# Altium PCB Plytka_gorna_lora_czujniki.PcbDoc
Units mm, origin at the board's own origin, x right, y up, seen from the top; angles counter-clockwise.
Board outline 49 x 49 mm, 2 copper layers (Top Layer, Bottom Layer), stack 1.58 mm thick; 12 components, 11 nets, 62 pads, 206 vias.
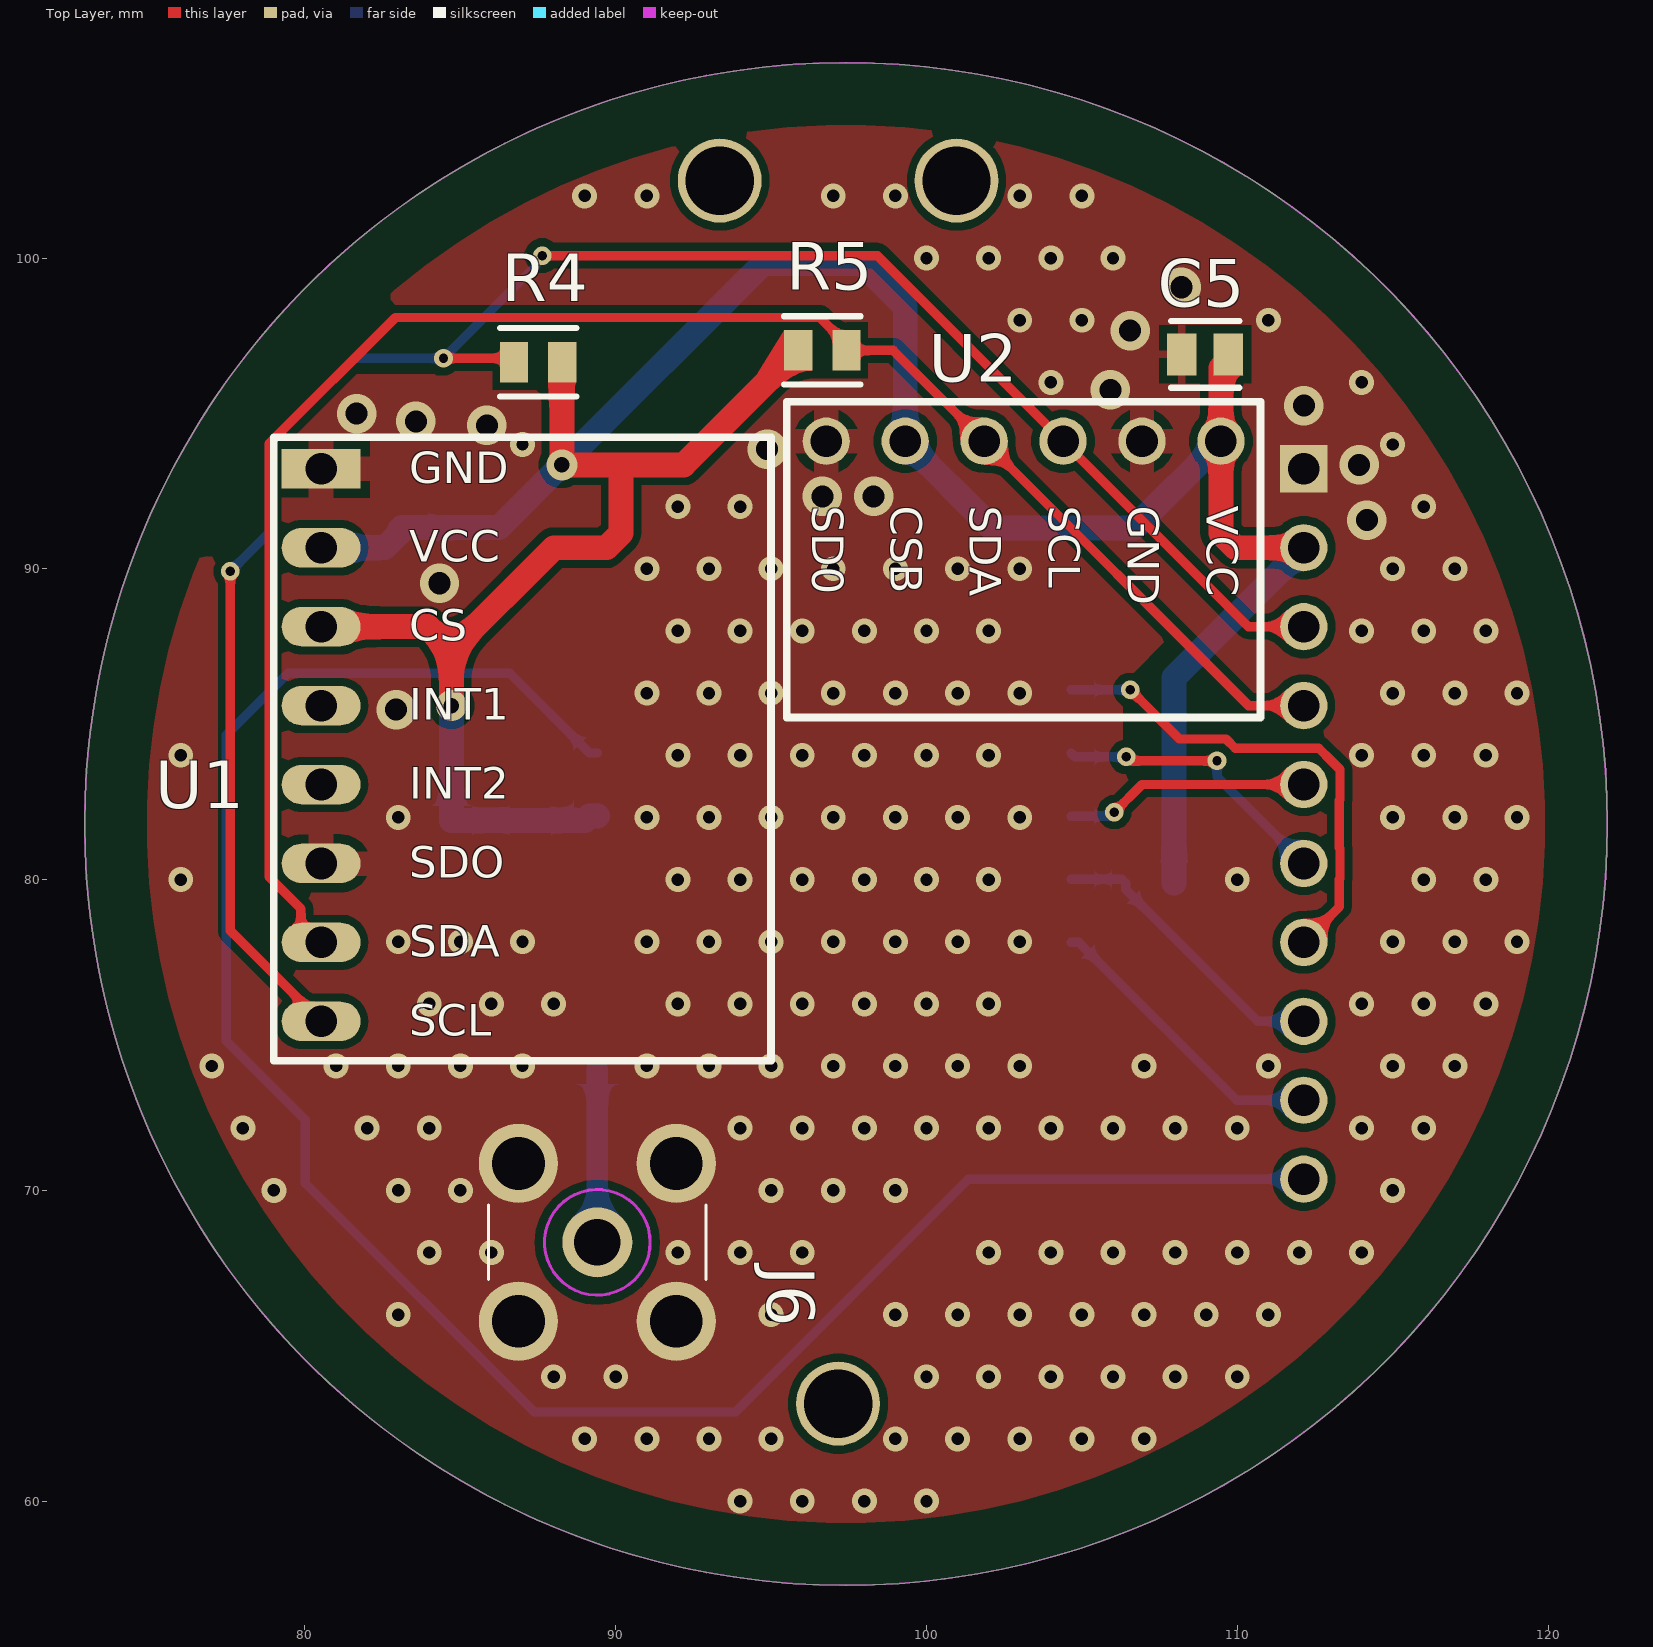
[diagram p0: Top Layer view]
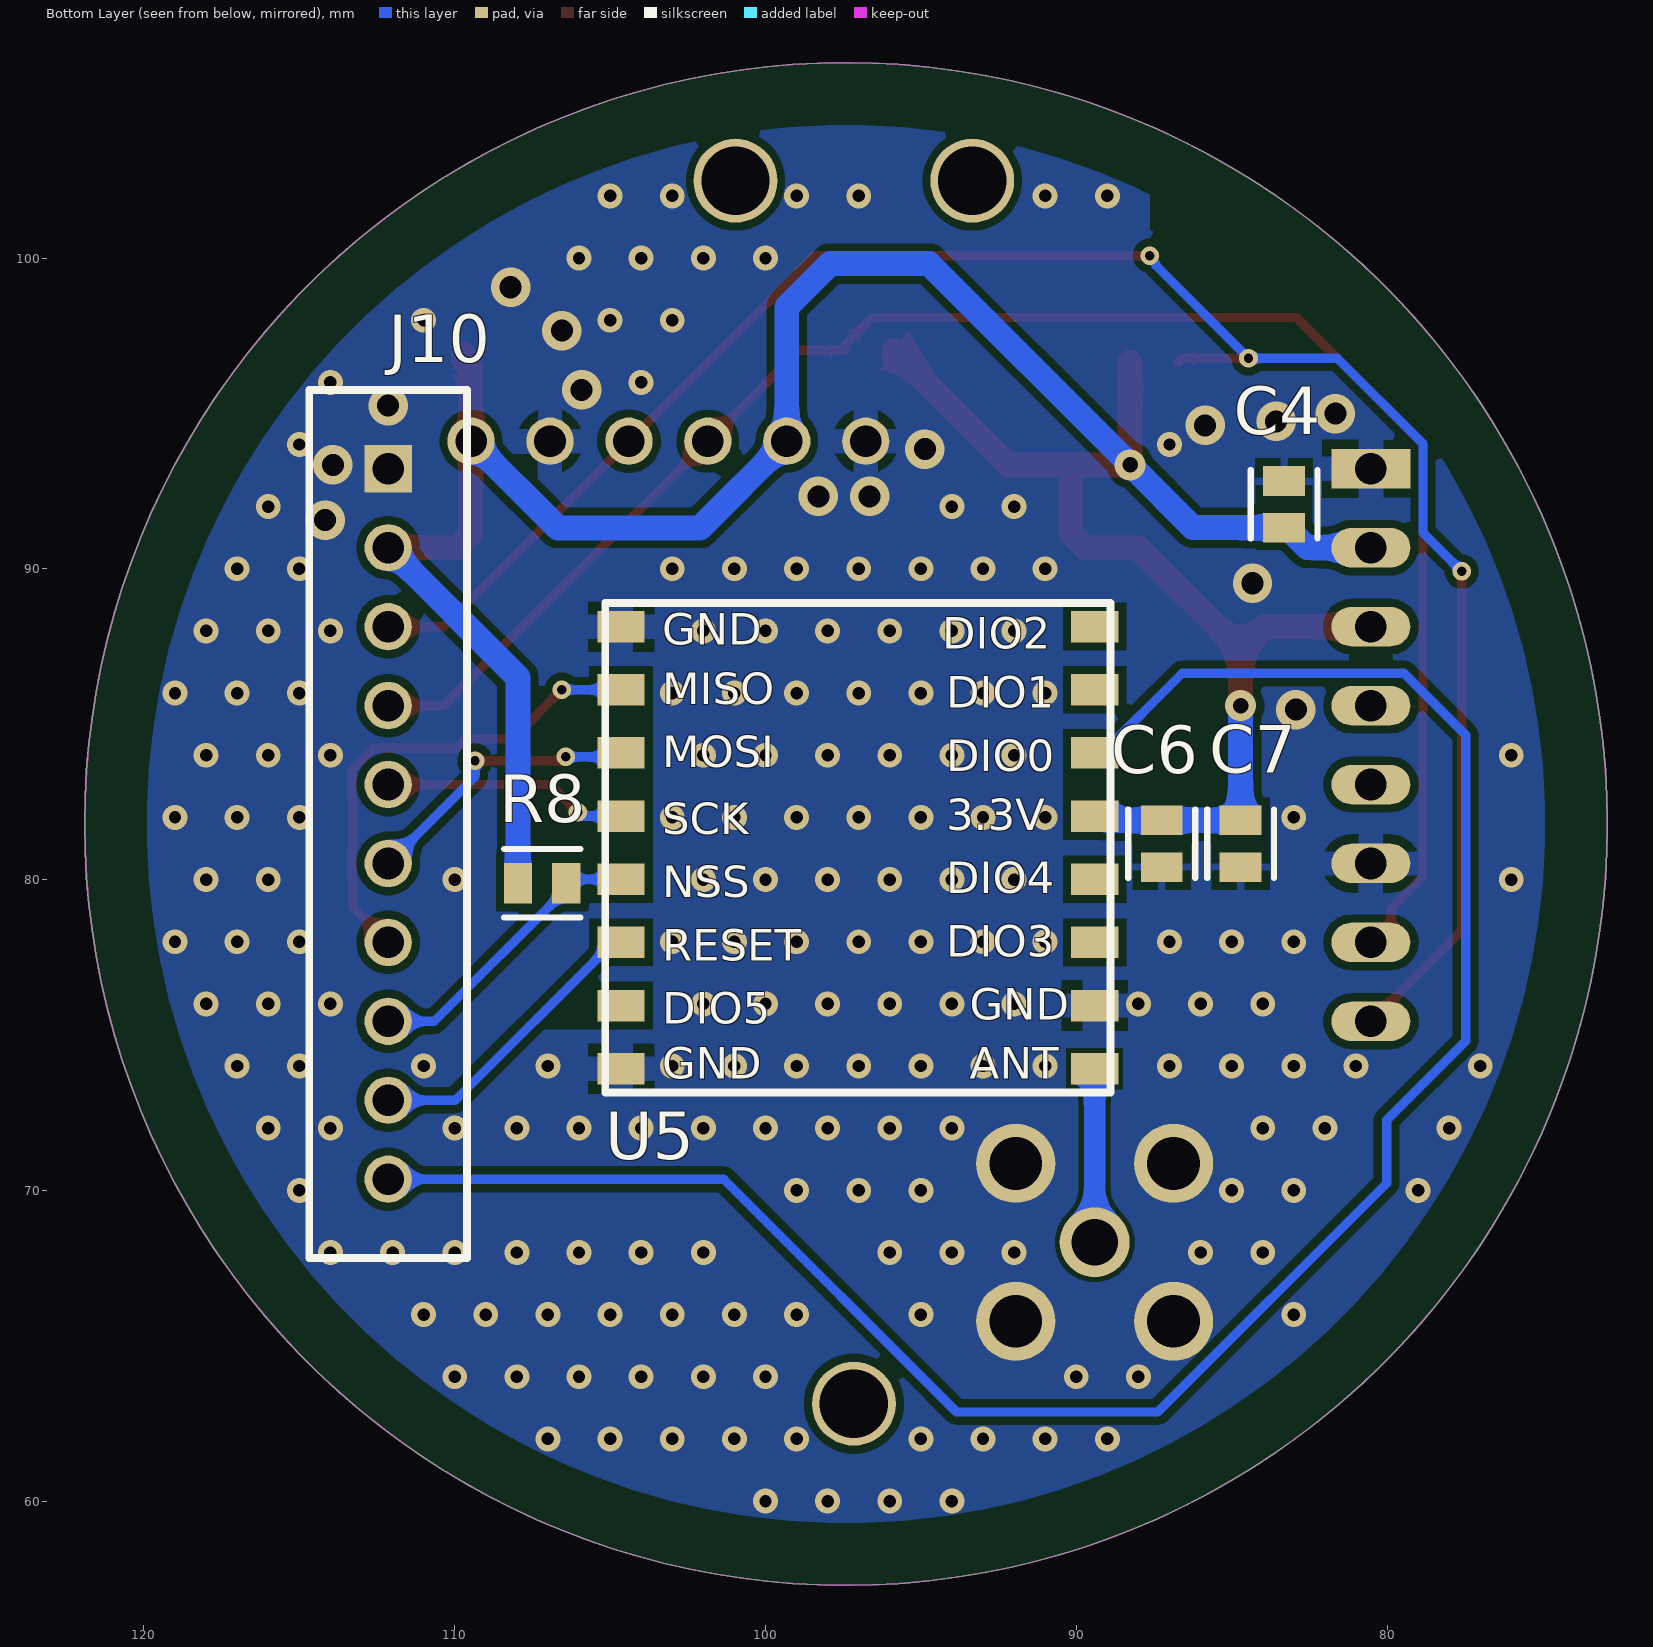
[diagram p1: Bottom Layer view, seen from below]
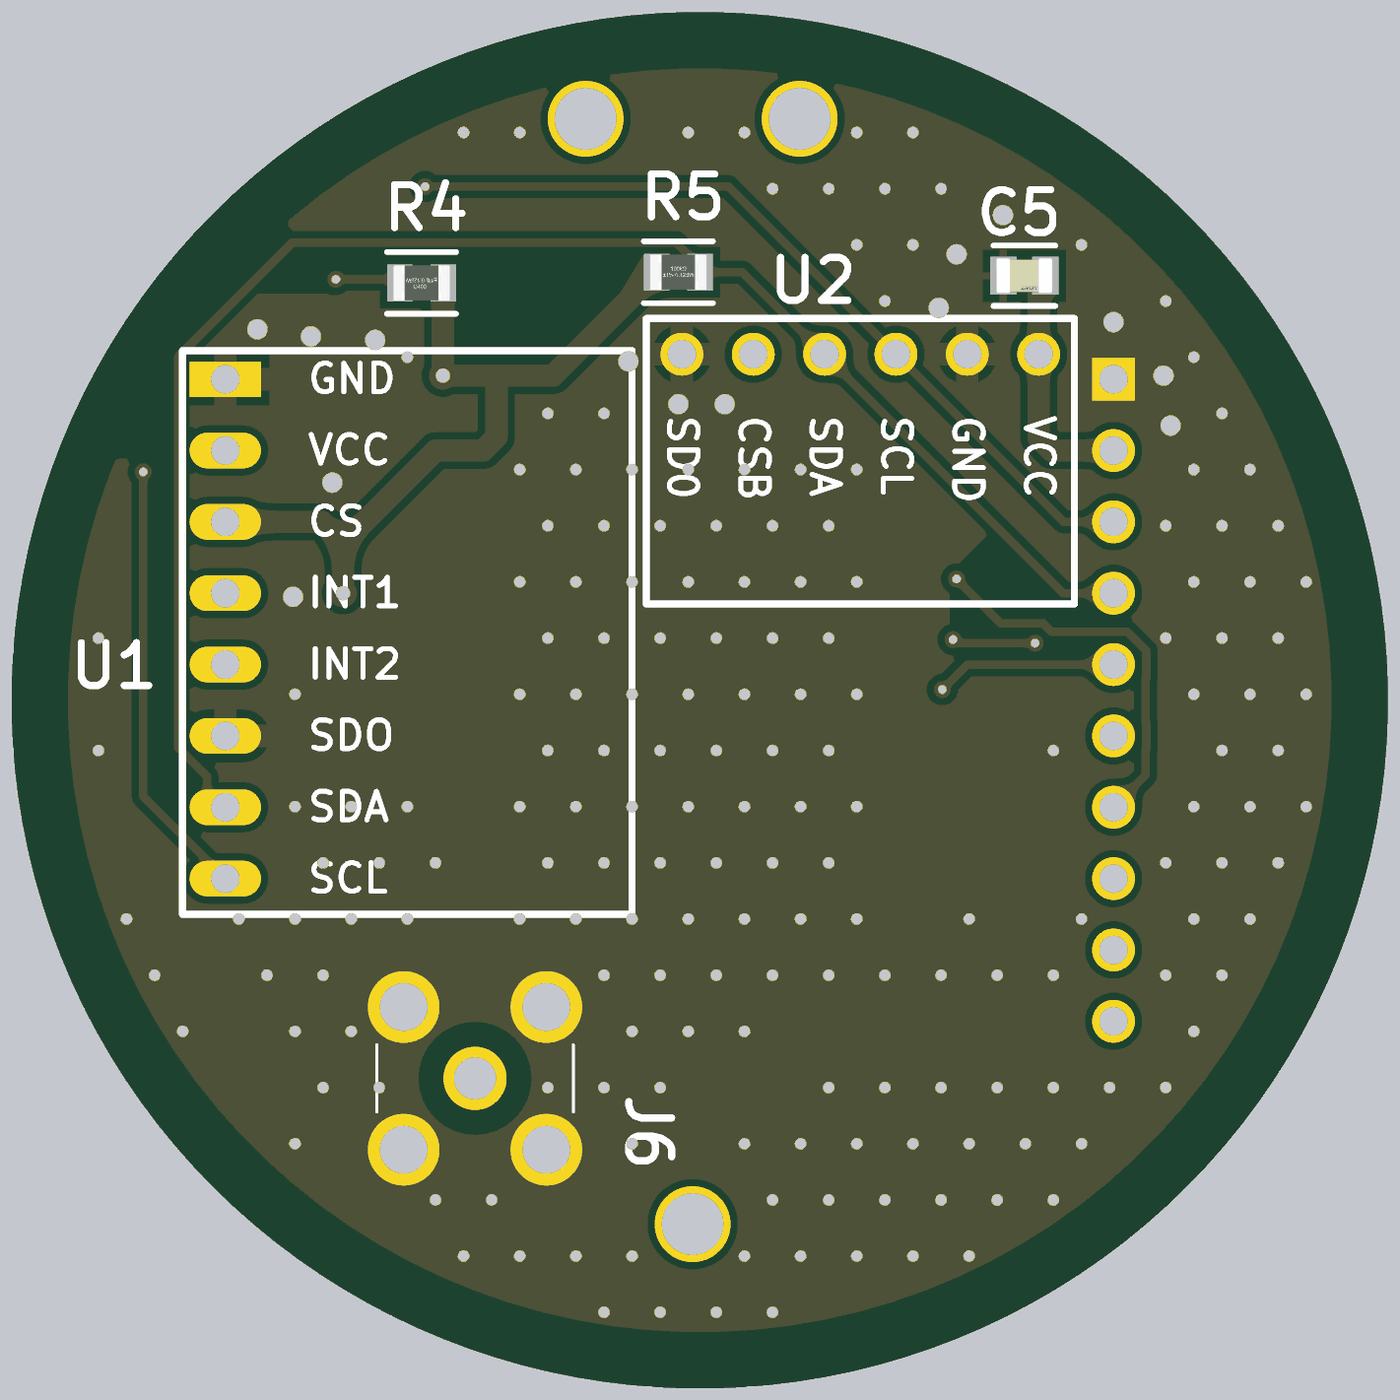
[diagram p2: 3D render of the assembled board from above, using the file's embedded part models]
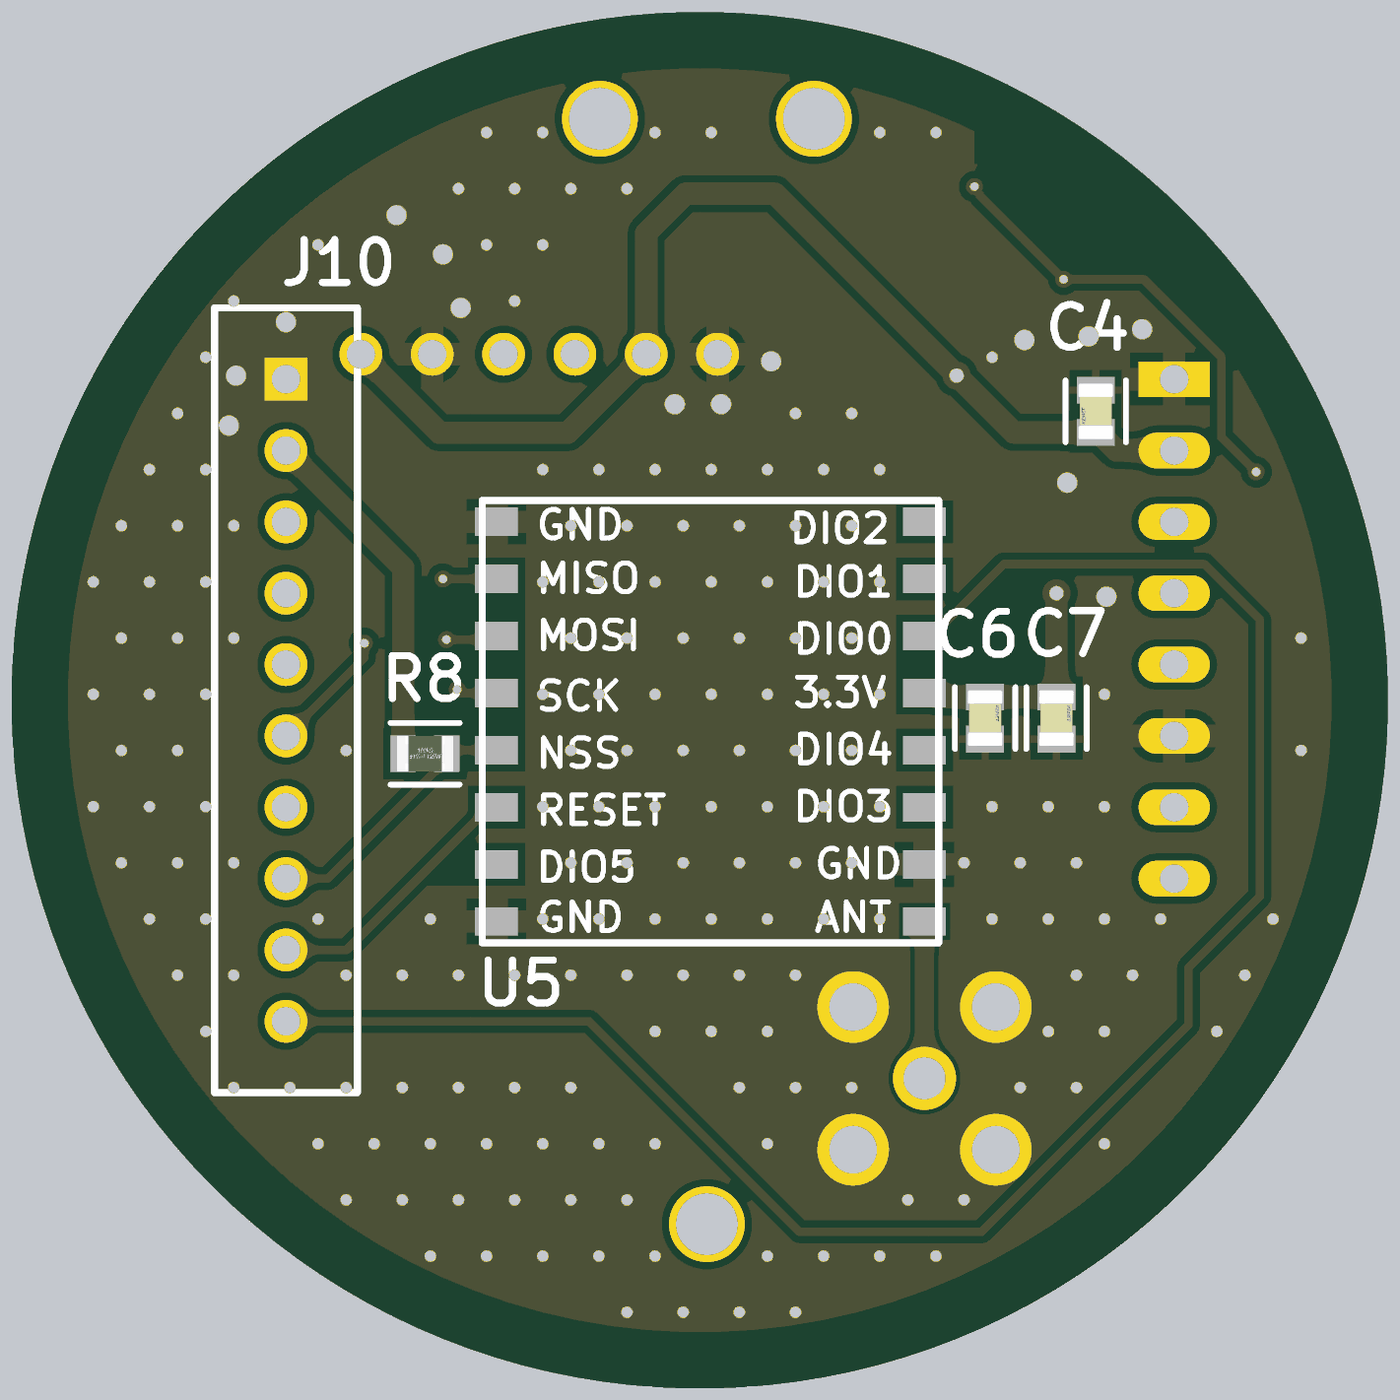
[diagram p3: 3D render of the assembled board from below, using the file's embedded part models]

## Layer stack, top to bottom
Top Solder: solder mask 0.0102, Solder Resist, Dk 3.5
Top Layer: signal copper 0.0356
Dielectric 1: dielectric 1.5086, FR-4, Dk 4.8
Bottom Layer: signal copper 0.0356
Bottom Solder: solder mask 0.0102, Solder Resist, Dk 3.5

## Board outline
72.909,81.788 ccw(c97.409,81.788) 97.409,57.288 ccw(c97.409,81.788) 121.909,81.788 ccw(c97.409,81.788) 97.409,106.288 ccw(c97.409,81.788)

## Design rules (kind name [scope] priority, off if disabled: settings)
AssemblyTestPointUsage AssemblyTestPointUsage_1 [All] p2:
AssemblyTestpoint AssemblyTestpoint_1 [All] p2: testpointundercomponent=TRUE minsize=1.016 maxsize=2.54 preferedsize=1.524 minholesize=0 maxholesize=1.016 preferedholesize=0.813 testpointgrid=0.025 usegrid=TRUE gridtolerance=0 allowsidetop=TRUE allowsidebottom=TRUE
BoardOutlineClearance [All] p1: gap=2 ignorepadtopadclearanceinfootprint=FALSE except(0: Text-OutlineEdge Text-CavityEdge Text-CutoutEdge Text-SplitBarrior Text-SplitContinuation; 0.5: Arc-OutlineEdge Arc-CavityEdge Arc-CutoutEdge Arc-SplitBarrior Arc-SplitContinuation Track-OutlineEdge Track-CavityEdge Track-CutoutEdge Track-SplitBarrior Track-SplitContinuation)
Clearance Antena_1 [InNetClass('RF_50R') vs InNet('GND')] p1: gap=0.15 ignorepadtopadclearanceinfootprint=FALSE
Clearance [All] p2: gap=0.254 ignorepadtopadclearanceinfootprint=FALSE
ComponentClearance ComponentClearance_1 [All] p2: gap=0.254 collisioncheckmode=3 verticalgap=0.254 showdistances=FALSE
DiffPairsRouting DiffPairsRouting_1 [All] p2: maxlimit=0.254 minlimit=0.254 mostfreqgap=0.254 toplayer_minwidth=0.381 toplayer_maxwidth=0.381 toplayer_prefwidth=0.381 bottomlayer_minwidth=0.381 bottomlayer_maxwidth=0.381 bottomlayer_prefwidth=0.381 maxuncoupledlength=12.7
FabricationTestPointUsage FabricationTestPointUsage_1 [All] p2: valid=0 allowmultiple=FALSE
FabricationTestpoint FabricationTestpoint_1 [All] p2: side=3 testpointundercomponent=TRUE minsize=1.016 maxsize=2.54 preferedsize=1.524 minholesize=0 maxholesize=1.016 preferedholesize=0.813 testpointgrid=0.025 allowsidetop=TRUE allowsidebottom=TRUE usegrid=TRUE gridtolerance=0
FanoutControl Fanout_BGA_1 [IsBGA] p1: bgadir=Out bgaviamode=Centered fanoutstyle=Auto fanoutdirection=Alternating viagrid=0.025 // Fanout_BGA (Default Rule)
FanoutControl Fanout_BGA [IsBGA] p2: bgadir=Out bgaviamode=Centered fanoutstyle=Auto fanoutdirection=Alternating viagrid=0.025 // Fanout_BGA (Default Rule)
FanoutControl Fanout_LCC [IsLCC] p3: bgadir=Out bgaviamode=Centered fanoutstyle=Auto fanoutdirection=Alternating viagrid=0.025 // Fanout_LCC (Default Rule)
FanoutControl Fanout_LCC_1 [IsLCC] p4: bgadir=Out bgaviamode=Centered fanoutstyle=Auto fanoutdirection=Alternating viagrid=0.025 // Fanout_LCC (Default Rule)
FanoutControl Fanout_SOIC_1 [IsSOIC] p5: bgadir=Out bgaviamode=Centered fanoutstyle=Auto fanoutdirection=Alternating viagrid=0.025 // Fanout_SOIC (Default Rule)
FanoutControl Fanout_SOIC [IsSOIC] p6: bgadir=Out bgaviamode=Centered fanoutstyle=Auto fanoutdirection=Alternating viagrid=0.025 // Fanout_SOIC (Default Rule)
FanoutControl Fanout_Small_1 [(CompPinCount < 5)] p7: bgadir=Out bgaviamode=Centered fanoutstyle=Auto fanoutdirection=OutThenIn viagrid=0.025 // Fanout_Small (Default Rule)
FanoutControl Fanout_Small [(CompPinCount < 5)] p8: bgadir=Out bgaviamode=Centered fanoutstyle=Auto fanoutdirection=OutThenIn viagrid=0.025 // Fanout_Small (Default Rule)
FanoutControl Fanout_Default [All] p9: bgadir=Out bgaviamode=Centered fanoutstyle=Auto fanoutdirection=Alternating viagrid=0.025 // Fanout_Default (Default Rule)
FanoutControl Fanout_Default_1 [All] p10: bgadir=Out bgaviamode=Centered fanoutstyle=Auto fanoutdirection=Alternating viagrid=0.025 // Fanout_Default (Default Rule)
Height Height_1 [All] p2: minheight=0 maxheight=25.4 prefheight=12.7
HoleSize HoleSize_1 [All] p2: absolutevalues=TRUE maxlimit=2.54 minlimit=0.025 maxpercent=80.000 minpercent=20.000
HoleToHoleClearance HoleToHoleClearance_1 [All] p2: gap=0.254 allowstackedmicrovias=TRUE
LayerPairs LayerPairs_1 [All] p2: enforce=TRUE
MinimumSolderMaskSliver MinimumSolderMaskSliver_1 [All] p2: minsoldermaskwidth=0.254
NetAntennae NetAntennae_1 [All] p2: netantennaetolerance=0
PasteMaskExpansion PasteMaskExpansion_1 [All] p2: expansion=0
PlaneClearance PlaneClearance_1 [All] p2: clearance=0.508
PlaneConnect PlaneConnect_1 [All] p2: planeconnectstyle=Relief reliefexpansion=0.508 reliefentries=4 reliefconductorwidth=0.254 reliefairgap=0.254
PolygonConnect DirectConnect_Serwa [(InComponent('J10') or InComponent('J6')) and InNet('GND')] p1: connectstyle=Direct reliefconductorwidth=0.254 reliefentries=4 polygonreliefangle="90 Angle" airgapwidth=0.254
PolygonConnect PolygonConnect_J1 [All vs InComponent('U1') or InComponent('U2') or InComponent('U5')] p2: connectstyle=Relief reliefconductorwidth=0.8 reliefentries=4 polygonreliefangle="90 Angle" airgapwidth=0.3
PolygonConnect Relief_U4_Przetwornica [InComponent('U4') and InNet('GND')] p3: connectstyle=Relief reliefconductorwidth=0.6 reliefentries=4 polygonreliefangle="90 Angle" airgapwidth=0.254
PolygonConnect PolygonConnect_1 [All] p4: thpad.connectstyle=Relief thpad.reliefconductorwidth=0.254 thpad.reliefentries=4 thpad.polygonreliefangle="90 Angle" thpad.airgapwidth=0.254 smdpad.connectstyle=Relief smdpad.reliefconductorwidth=0.254 smdpad.reliefentries=4 smdpad.polygonreliefangle="90 Angle" smdpad.airgapwidth=0.254 via.connectstyle=Direct via.reliefconductorwidth=0.254 via.reliefentries=4 via.polygonreliefangle="90 Angle" via.airgapwidth=0.254
RoutingCorners RoutingCorners_1 [All] p2: cornerstyle=45-Degree minsetback=2.54 maxsetback=2.54
RoutingLayers RoutingLayers_1 [All] p2: top layer_v5=TRUE bottom layer_v5=TRUE
RoutingPriority RoutingPriority_1 [All] p2: routingpriority=0
RoutingTopology RoutingTopology_1 [All] p2: topology=Shortest
RoutingVias [All] p1: holewidth=0.3 width=0.6 viastyle="Through Hole" minholewidth=0.2 minwidth=0.45 maxholewidth=0.8 maxwidth=1.5
ShortCircuit ShortCircuit_1 [All] p2: allowed=FALSE
SilkToSilkClearance SilkToSilkClearance_1 [All] p2: silktosilkclearance=0.254
SilkToSolderMaskClearance SilkToSolderMaskClearance_1 [IsPad] p2: minsilkscreentomaskgap=0.254 clearancetoexposedcopper=TRUE
SolderMaskExpansion SolderMask_Vias_Tented [IsVia] p1: expansion=0 istentingtop=TRUE
SolderMaskExpansion SolderMaskExpansion_1 [All] p2: expansion=0 istentingtop=FALSE
SupplyNets "Schematic Supply Nets" [InNet('GND')] p1: voltage=0.000
UnRoutedNet UnRoutedNet_1 [All] p2:
UnpouredPolygon UnpouredPolygon_1 [All] p2:
Width Antena [InNetClass('RF_50R')] p1: maxlimit=0.689 minlimit=0.689 preferedwidth=0.689 impedanceprofiledriven=TRUE impedanceprofileid={41299183-0908-48C8-ACB2-1323AC1D632C} impedanceprofilevalue=50.000000 minimp=50.000000 maximp=50.000000 favimp=50.000000
Width Width_1 [InNet('VCC') or InNet('+5V') or InNet('+3.3V') or InNet('NetJ1_2') or InNet('NetD1_2') or InNet('NetJ3_1') or InNet('NetD1_1') or InNet('NetD2_1')] p2: maxlimit=1.2 minlimit=0.6 preferedwidth=0.8
Width Width_2 [All] p3: maxlimit=0.5 minlimit=0.2 preferedwidth=0.3
25 further rules are at their usual default settings.

## Classes and differential pairs
net class RF_50R: NetJ6_5

## Components (designator, comment, footprint, x,y, rotation, side; value= is the part's Value field where it differs from the comment)
C4 "100nF" FP-C0805C-DN-MFG 83.312,92.075 r90 bottom value="0.10 μF"
C5 "100nF" FP-C0805C-DN-MFG 108.966,96.901 r180 top value="0.10 μF"
C6 "10uF" FP-C0805C-DN-MFG 87.249,81.153 r270 bottom value=10μF
C7 "100nF" FP-C0805C-DN-MFG 84.709,81.153 r270 bottom value="0.10 μF"
J6 "RF2-19A-T-00-50-G" RF219AT0050G 86.868,70.866 r270 top
J10 "PrzejscieTHT10" PrzejscieTHT10 114.681,67.818 r180 bottom
R4 "4.7kΩ" FP-CRGCQ0805-IPC_C 87.503,96.647 r180 top value=4.7KΩ
R5 "4.7kΩ" FP-CRGCQ0805-IPC_C 96.647,97.028 r0 top value=4.7KΩ
R8 "10kΩ" FP-CRGCQ0805-IPC_C 107.188,79.883 r180 bottom value=10KΩ
U1 "ADXL345" ADXL345 80.01,93.218 r0 top
U2 "BMP280" BMP280 95.504,95.377 r270 top
U5 "RFM95W-868S2R" RFM95W-868S2R 105.156,73.152 r180 bottom

## Footprints (in the part's own frame and the unit in brackets; to place one, negate y for a bottom-side part, rotate by r counter-clockwise, add the part's x,y. Pads: shape width x height; smd on the part's side, far side on the other; paste and mask are expansions set on the pad)
ADXL345 [mil]
  rect 100x50 hole 40: 1(20,0)
  oval 100x50 hole 40: 2(20,-100) 3(20,-200) 4(20,-300) 5(20,-400) 6(20,-500) 7(20,-600) 8(20,-700)
  silkscreen extent -40,-750 590,40
BMP280 [mil]
  round 60 hole 40: 1(50,550) 2(50,450) 3(50,350) 4(50,250) 5(50,150) 6(50,50)
  silkscreen extent 0,0 400,600
FP-C0805C-DN-MFG [mm]
  rect 0.95x1.35 smd paste+0 mask+0: 1(-0.75,0) 2(0.75,0)
  silkscreen extent -1.1,-1.07 1.1,1.07, body extent -1,-0.63 1,0.63, height 0.88
FP-CRGCQ0805-IPC_C [mm]
  rect 0.906x1.31 smd paste+0 mask+0: 1(-0.776,0) 2(0.776,0)
  silkscreen extent -1.23,-1.1 1.23,1.1, body extent -1.33,-0.8 1.33,0.8, height 0.25
PrzejscieTHT10 [mil]
  rect 60x60 hole 40: 1(100,1000)
  round 60 hole 40: 2(100,900) 3(100,800) 4(100,700) 5(100,600) 6(100,500) 7(100,400) 8(100,300) 9(100,200) 10(100,100)
  silkscreen extent 0,0 200,1100
RF219AT0050G [mm]
  round 2.55 hole 1.7: 1(0,0) 2(0,5.08) 3(5.08,0) 4(5.08,5.08)
  round 2.25 hole 1.5: 5(2.54,2.54)
  silkscreen extent 1.34,-0.96 3.74,6.04
RFM95W-868S2R [mil]
  rect 60x40 smd: 1(20,590) 2(20,510) 3(20,430) 4(20,350) 5(20,270) 6(20,190) 7(20,110) 8(20,30) 9(620,30) 10(620,110) 11(620,190) 12(620,270) 13(620,350) 14(620,430) 15(620,510) 16(620,590)
  silkscreen extent 0,0 640,620

## Part data
C4 C5 C7: library part CMP-2007-00274-2, "CAP CER 0.1UF 16V X7R 0805", Capacitance="0.10 μF", Manufacturer=KEMET, Manufacturer Part Number=C0805C104K4RACTU, Package=C0805C-DN, Temperature="-55°C to +125°C", Temperature Characteristic=X7R, Temperature Coefficient=30ppm/°C, Temperature Range High=+125°C, Temperature Range Low=-55°C, Tolerance=0.1, Voltage Rating="16 V", Automotive=No, Category=Cap, ComponentLink2Description=Datasheet, ComponentLink2URL=https://content.kemet.com/datasheets/KEM_C1003_C0G_SMD.pdf, Device Class L1="Passive Components", Device Class L2=Capacitors, Device Class L3="Ceramic Capacitors", Digikey Description="CAP CER 0.1UF 16V X7R 0805", Height=0.88mm, Ipc Land Pattern Name=CAPC200125X78, Lead Free=Yes, Material=Ceramic, Mouser Description="Multilayer Ceramic Capacitors MLCC - SMD/SMT 16volts 0.1uF X7R 10%", Octopart=https://octopart.com/c0805c104k4ractu-kemet-92155, RoHS=TRUE
C6: library part CMP-2007-00274-2, "CAP CER 10UF 16V X7R 0805", Capacitance=10μF, Manufacturer=KEMET, Manufacturer Part Number=C0805C104K4RACTU, Package=C0805C-DN, Temperature="-55°C to +125°C", Temperature Characteristic=X7R, Temperature Coefficient=30ppm/°C, Temperature Range High=+125°C, Temperature Range Low=-55°C, Tolerance=0.1, Voltage Rating="16 V", Automotive=No, Category=Cap, ComponentLink2Description=Datasheet, ComponentLink2URL=https://content.kemet.com/datasheets/KEM_C1003_C0G_SMD.pdf, Device Class L1="Passive Components", Device Class L2=Capacitors, Device Class L3="Ceramic Capacitors", Digikey Description="CAP CER 0.1UF 16V X7R 0805", Height=0.88mm, Ipc Land Pattern Name=CAPC200125X78, Lead Free=Yes, Material=Ceramic, Mouser Description="Multilayer Ceramic Capacitors MLCC - SMD/SMT 16volts 0.1uF X7R 10%", Octopart=https://octopart.com/c0805c104k4ractu-kemet-92155, RoHS=TRUE
J6: "Conn SMA 0Hz to 18GHz 50Ohm Solder ST Thru-Hole RCP Gold", Manufacturer_Name="Adam Tech", Mouser Part Number=737-RF219AT0050G, Arrow Part Number=RF2-19A-T-00-50-G, Arrow Price/Stock=https://www.arrow.com/en/products/rf2-19a-t-00-50-g/adam-tech?region=nac, Datasheet Link=chrome-extension://efaidnbmnnnibpcajpcglclefindmkaj/https://www.mouser.it/datasheet/2/4/rf2_19a_t_00_50_g_data_sheet-3397228.pdf, Geometry.Height=9.6mm, Manufacturer_Part_Number=RF2-19A-T-00-50-G, Mouser Price/Stock=https://www.mouser.co.uk/ProductDetail/Adam-Tech/RF2-19A-T-00-50-G?qs=HoCaDK9Nz5fMXe4fVjtozw%3D%3D
R4 R5: library part CMP-03211-002989-1, "CRGCQ 0805 4.7K 5%", Ambient Temperature Range High=+70°C, Manufacturer="TE Connectivity", Manufacturer Part Number=CRGCQ0805J10K, Package=CRGCQ0805, Power Rating=0.125W, Resistance=4.7KΩ, Temperature="-55°C to +155°C", Temperature Coefficient=±100ppm/°C, Temperature Range High=+155°C, Temperature Range Low=-55°C, Tolerance=0.05, Voltage Rating=150V, Automotive=Yes, Automotive Grade="Grade 914", Category=Res, ComponentLink2Description=Datasheet, ComponentLink2URL=https://www.te.com/commerce/DocumentDelivery/DDEController?Action=showdoc&DocId=Data+Sheet%7F1773204-3%7F1%7Fpdf%7FEnglish%7FENG_DS_1773204-3_1.pdf%7F4-2176341-923, Composition="Thick Film", Device Class L1="Passive Components", Device Class L2=Resistors, Device Class L3="Chip SMD Resistors", Digikey Description="CRGCQ 0805 10K 5%", Height=0.65mm, Ipc Land Pattern Name=RESC200125X55, Lead Free=Yes, Mouser Description="Res Thick Film 0805 10K Ohm 5% 0.125W(1/8W) ±100ppm/C Pad SMD Automotive T/R", Octopart=https://octopart.com/crgcq0805j10k-te+connectivity-91018201, RoHS=TRUE, Series=CRGCQ
R8: library part CMP-03211-002989-1, "CRGCQ 0805 10K 5%", Ambient Temperature Range High=+70°C, Manufacturer="TE Connectivity", Manufacturer Part Number=CRGCQ0805J10K, Package=CRGCQ0805, Power Rating=0.125W, Resistance=10KΩ, Temperature="-55°C to +155°C", Temperature Coefficient=±100ppm/°C, Temperature Range High=+155°C, Temperature Range Low=-55°C, Tolerance=0.05, Voltage Rating=150V, Automotive=Yes, Automotive Grade="Grade 914", Category=Res, ComponentLink2Description=Datasheet, ComponentLink2URL=https://www.te.com/commerce/DocumentDelivery/DDEController?Action=showdoc&DocId=Data+Sheet%7F1773204-3%7F1%7Fpdf%7FEnglish%7FENG_DS_1773204-3_1.pdf%7F4-2176341-923, Composition="Thick Film", Device Class L1="Passive Components", Device Class L2=Resistors, Device Class L3="Chip SMD Resistors", Digikey Description="CRGCQ 0805 10K 5%", Height=0.65mm, Ipc Land Pattern Name=RESC200125X55, Lead Free=Yes, Mouser Description="Res Thick Film 0805 10K Ohm 5% 0.125W(1/8W) ±100ppm/C Pad SMD Automotive T/R", Octopart=https://octopart.com/crgcq0805j10k-te+connectivity-91018201, RoHS=TRUE, Series=CRGCQ

## Free pads (board coordinates)
  round 2.7 hole 2.2: 3(93.345,102.489) 4(100.965,102.489) 5(97.155,63.135)

## Via types
v1: diameter 0.8, hole 0.4, Top Layer to Bottom Layer, tented both sides, 183 vias
v2: diameter 1.27, hole 0.711, Top Layer to Bottom Layer, tented both sides, 14 vias
v3: diameter 0.6, hole 0.3, Top Layer to Bottom Layer, tented both sides, 7 vias
v4: diameter 1, hole 0.5, Top Layer to Bottom Layer, tented both sides, 2 vias

## Nets (pads, with @x,y where several pads share a name; then routed paths per layer and width w, separated by ;. In a path a pad name is that pad's centre, name@x,y a point inside that pad or via, vN(x,y) a via of type N, cw(c..) or ccw(c..) an arc to the next point about the centre after c; other vN are vias at no path point)
+3.3V: C4.1 C5.1 C6.1 C7.1 J10.2 R4.1 R5.1 R8.1 U1.2 U1.3 U2.1 U2.5 U5.13 | length 97.8
  Top Layer w0.8: U1.3 83.947,88.138 84.709,87.376 ; v4(84.709,85.598) 84.709,87.376 ; R4.1 88.265,96.633 v4(88.265,93.345) 90.226,93.345 ; R5.1 95.871,96.826 95.818,96.773 95.616,96.773 92.188,93.345 90.226,93.345 ; C5.1 109.716,96.701 109.474,96.459 U2.1 109.474,91.147 109.943,90.678 J10.2 ; 84.709,87.376 88.011,90.678 89.701,90.678 90.17,91.147 90.17,93.289 90.226,93.345
  Bottom Layer w0.8: U1.2 82.568,90.678 83.037,91.147 83.037,91.25 83.112,91.325 C4.1 86.245,91.325 v4(88.265,93.345) 94.742,99.822 97.917,99.822 99.314,98.425 U2.5 102.108,91.313 106.68,91.313 U2.1 ; v4(84.709,85.598) C7.1 C6.1 89.015,81.903 89.154,82.042 U5.13 ; R8.1 107.964,86.501 J10.2
GND: C4.2 C5.2 C6.2 C7.2 J6.1 J6.2 J6.3 J6.4 J10.1 U1.1 U1.6 U2.2 U2.6 U5.1 U5.8 U5.10
  other v1: 94,60 96,60 98,60 100,60 89,62 91,62 93,62 95,62 99,62 101,62 103,62 105,62 107,62 88,64 90,64 100,64 102,64 104,64 106,64 108,64 110,64 83,66 95,66 99,66 101,66 103,66 105,66 107,66 109,66 111,66 84,68 86,68 92,68 94,68 96,68 102,68 104,68 106,68 108,68 110,68 112,68 114,68 79,70 83,70 85,70 95,70 97,70 99,70 115,70 78,72 82,72 84,72 94,72 96,72 98,72 100,72 102,72 104,72 106,72 108,72 110,72 114,72 116,72 77,74 81,74 83,74 85,74 87,74 91,74 93,74 95,74 97,74 99,74 101,74 103,74 107,74 111,74 115,74 117,74 84,76 86,76 88,76 92,76 94,76 96,76 98,76 100,76 102,76 114,76 116,76 118,76 83,78 85,78 87,78 91,78 93,78 95,78 97,78 99,78 101,78 103,78 115,78 117,78 119,78 76,80 92,80 94,80 96,80 98,80 100,80 102,80 110,80 116,80 118,80 83,82 91,82 93,82 95,82 97,82 99,82 101,82 103,82 115,82 117,82 119,82 76,84 92,84 94,84 96,84 98,84 100,84 102,84 114,84 116,84 118,84 91,86 93,86 95,86 97,86 99,86 101,86 103,86 115,86 117,86 119,86 92,88 94,88 96,88 98,88 100,88 102,88 114,88 116,88 118,88 91,90 93,90 95,90 97,90 99,90 101,90 103,90 115,90 117,90 92,92 94,92 116,92 87,94 115,94 104,96 114,96 103,98 105,98 111,98 100,100 102,100 104,100 106,100 89,102 91,102 97,102 99,102 103,102 105,102
  other v2: 82.931,85.471 84.328,89.535 114.173,91.567 96.647,92.329 98.298,92.329 113.919,93.345 94.869,93.853 85.852,94.615 83.566,94.742 81.661,94.996 112.141,95.25 105.918,95.758 106.553,97.663 108.204,99.06
I2C_SCL: J10.3 R4.2 U1.8 U2.3 | length 63.5
  Top Layer w0.3: v3(77.597,89.916) 77.597,78.359 U1.8 ; v3(84.455,96.774) 86.6,96.774 R4.2 ; v3(87.63,100.076) 98.425,100.076 U2.3 110.363,88.138 J10.3
  Bottom Layer w0.3: v3(77.597,89.916) 78.844,91.163 78.844,94.02 81.598,96.774 v3(84.455,96.774) 87.446,99.765 87.446,99.81 87.63,99.995 v3(87.63,100.076)
I2C_SDA: J10.4 R5.2 U1.7 U2.4 | length 57.1
  Top Layer w0.3: U1.7 80.317,77.978 79.869,78.426 79.869,79.063 78.844,80.088 78.844,94.02 82.911,98.087 96.566,98.087 97.423,97.23 R5.2 98.933,97.028 U2.4 110.363,85.598 J10.4
LORA_CS: J10.8 R8.2 U5.5 | length 9.5
  Bottom Layer w0.3: U5.5 106.285,80.01 R8.2 106.412,79.681 110.655,75.438 J10.8
LORA_DIO0: J10.10 U5.14 | length 67.6
  Bottom Layer w0.3: U5.14 89.154,84.074 86.591,86.637 79.453,86.637 77.47,84.654 77.47,74.803 80.01,72.263 80.01,70.231 87.376,62.865 93.853,62.865 101.346,70.358 J10.10
LORA_RST: J10.9 U5.6 | length 9.6
  Bottom Layer w0.3: U5.6 104.902,77.978 109.982,72.898 J10.9
NetJ6_5: J6.5 U5.9 | length 5.6
  Bottom Layer w0.689: J6.5 U5.9
SPI_MISO: J10.7 U5.2 | length 15.8
  Top Layer w0.3: v3(106.553,86.106) 108.135,84.524 109.639,84.524 109.939,84.224 112.624,84.224 113.029,83.819 113.307,83.541 113.307,82.575 113.284,82.552 113.284,81.024 113.307,81.001 113.307,80.035 113.284,80.012 113.284,79.121 J10.7
  Bottom Layer w0.3: U5.2 v3(106.553,86.106)
SPI_MOSI: J10.6 U5.3 | length 9.3
  Top Layer w0.3: v3(106.426,83.947) 106.553,83.82 v3(109.347,83.82)
  Bottom Layer w0.3: U5.3 104.775,83.947 v3(106.426,83.947) ; v3(109.347,83.82) 109.347,83.312 J10.6
SPI_SCK: J10.5 U5.4 | length 7.9
  Top Layer w0.3: v3(106.045,82.169) 106.934,83.058 J10.5
  Bottom Layer w0.3: U5.4 105.837,82.042 105.964,82.169 v3(106.045,82.169)
pads on no net: U1.4 U1.5 U5.7 U5.11 U5.12 U5.15 U5.16

## Polygon pours and split planes (outlines as drawn)
GND on Top Layer "GND_L01_P000" (solid, remove dead copper, pour order 0): 72.909,81.788 ccw(c97.409,81.788) 97.409,57.288 ccw(c97.409,81.788) 121.909,81.788 ccw(c97.409,81.788) 97.409,106.288 ccw(c97.409,81.788)
GND on Bottom Layer "GND_L02_P001" (solid, remove dead copper, pour order 1): 72.909,81.788 ccw(c97.409,81.788) 97.409,57.288 ccw(c97.409,81.788) 121.909,81.788 ccw(c97.409,81.788) 97.409,106.288 ccw(c97.409,81.788)

## Keep-outs
Top Layer:
  circle w0.1: c89.408,68.326 r1.7
Keep-Out Layer:
  circle w0.05: c97.409,81.788 r24.5

## Other copper
Top Layer:
  pour cut-out: 80.197,95.956 80.368,95.956 82.911,98.499 82.603,98.806 82.55,98.806 80.01,96.266
  pour cut-out: 106.316,84.501 106.316,85.56 106.324,85.552 106.524,85.552 107.645,84.432 107.562,84.349 107.562,84.232 106.908,84.232 106.74,84.4 106.74,84.417 106.621,84.417 106.536,84.501
  pour cut-out: 84.345,96.22 84.299,96.266 81.672,96.266 83.081,97.675 85.901,97.675 86.02,97.556 86.02,97.186 84.827,97.186 84.684,97.328 84.345,97.328 84.26,97.244 84.141,97.244 83.901,97.003 83.901,96.664 83.985,96.579 83.985,96.46 84.226,96.22
  pour cut-out: 78.819,77.72 78.009,78.53 78.009,90.288 77.911,90.386 76.873,90.386 76.708,90.551 76.708,90.814 76.872,90.978 76.835,91.015 76.835,92.148 78.24,93.553 78.295,93.498 78.432,93.498 78.432,79.917 79.401,78.948 79.39,78.938 79.39,78.72
  pour cut-out: 106.663,86.66 107.633,87.63 107.748,87.63 110.192,85.186 111.206,85.186 111.206,85.097 111.466,84.836 111.394,84.764 111.394,84.636 110.109,84.636 109.93,84.815 109.759,84.815 109.639,84.936 108.306,84.936 106.663,86.578
Bottom Layer:
  pour cut-out: 103.632,85.344 105.664,85.344 105.664,85.694 106.181,85.694 106.324,85.552 106.782,85.552 107.023,85.792 107.023,85.911 107.107,85.996 107.113,85.99 107.304,85.99 107.304,80.827 107.25,80.772 103.632,80.772 103.632,81.28 105.664,81.28 105.664,81.63 105.679,81.615 106.274,81.615 106.599,81.94 106.599,82.398 106.359,82.639 106.019,82.639 105.935,82.723 105.905,82.694 105.774,82.694 105.664,82.804 103.632,82.804 103.632,83.312 105.664,83.312 105.664,83.535 106.174,83.535 106.316,83.393 106.655,83.393 106.98,83.718 106.98,84.057 106.896,84.142 106.896,84.261 106.655,84.501 106.316,84.501 106.174,84.359 105.664,84.359 105.664,84.836 103.632,84.836
  pour cut-out: 105.664,75.184 107.188,75.184 105.923,76.449 105.741,76.449 105.664,76.372
  pour cut-out: 87.613,100.884 87.63,100.901 87.63,102.108 86.066,102.108 80.048,96.09 80.182,95.956 80.242,95.956 81.567,97.282 84.043,97.282 84.043,97.453 87.474,100.884
  pour cut-out: 85.431,86.225 85.369,86.163 85.369,82.632 88.323,82.632 88.392,82.563 88.633,82.804 90.424,82.804 90.424,83.312 88.392,83.312 88.392,84.253 86.42,86.225

## Silkscreen, mask and mechanical layers (free items; w line width, h text height)
Mechanical 1:
  circle w0.05: c97.409,81.788 r22.5

## Text inside footprints (layer, text, board x,y; h text height)
U1: Top Overlay "GND" at 83.363,92.761 h1.02; Top Overlay "VCC" at 83.363,90.221 h1.02; Top Overlay "CS" at 83.363,87.681 h1.02; Top Overlay "INT1" at 83.363,85.141 h1.02; Top Overlay "INT2" at 83.363,82.601 h1.02; Top Overlay "SDO" at 83.363,80.061 h1.02; Top Overlay "SDA" at 83.363,77.521 h1.02; Top Overlay "SCL" at 83.363,74.981 h1.02
U2: Top Overlay "SD0" at 96.317,92.024 h1.02 r270; Top Overlay "CSB" at 98.857,92.024 h1.02 r270; Top Overlay "SDA" at 101.397,92.024 h1.02 r270; Top Overlay "SCL" at 103.937,92.024 h1.02 r270; Top Overlay "GND" at 106.477,92.024 h1.02 r270; Top Overlay "VCC" at 109.017,92.024 h1.02 r270
U5: Bottom Overlay "GND" at 103.327,87.554 h1.02; Bottom Overlay "MISO" at 103.327,85.649 h1.02; Bottom Overlay "MOSI" at 103.327,83.617 h1.02; Bottom Overlay "SCK" at 103.327,81.458 h1.02; Bottom Overlay "NSS" at 103.327,79.426 h1.02; Bottom Overlay "RESET" at 103.327,77.394 h1.02; Bottom Overlay "DIO5" at 103.327,75.362 h1.02; Bottom Overlay "GND" at 103.327,73.584 h1.02; Bottom Overlay "ANT" at 93.421,73.584 h1.02; Bottom Overlay "GND" at 93.421,75.489 h1.02; Bottom Overlay "DIO3" at 94.183,77.521 h1.02; Bottom Overlay "DIO4" at 94.183,79.553 h1.02; Bottom Overlay "3.3V" at 94.183,81.585 h1.02; Bottom Overlay "DIO0" at 94.183,83.49 h1.02; Bottom Overlay "DIO1" at 94.183,85.522 h1.02; Bottom Overlay "DIO2" at 94.31,87.427 h1.02